# Altium PCB PCB1.PcbDoc
Units mm, origin at the board's own origin, x right, y up, seen from the top; angles counter-clockwise.
Board outline 29.77 x 25.83 mm, 2 copper layers (Top Layer, Bottom Layer); 17 components, 17 nets, 77 pads, 26 vias.
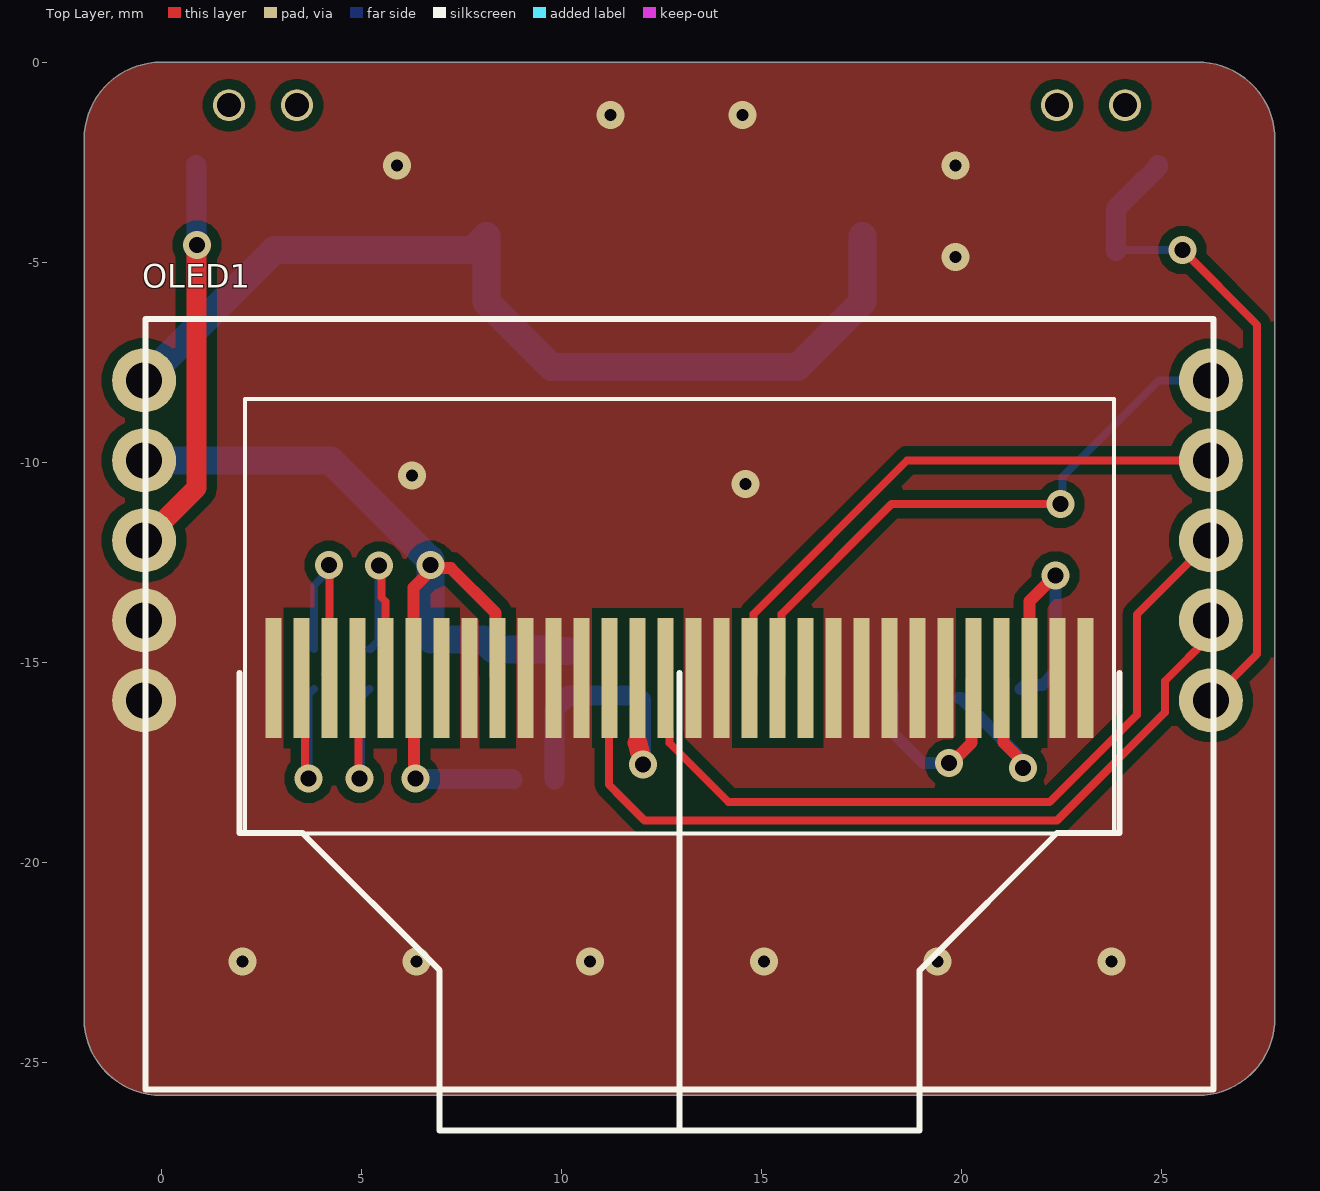
[diagram p0: Top Layer view]
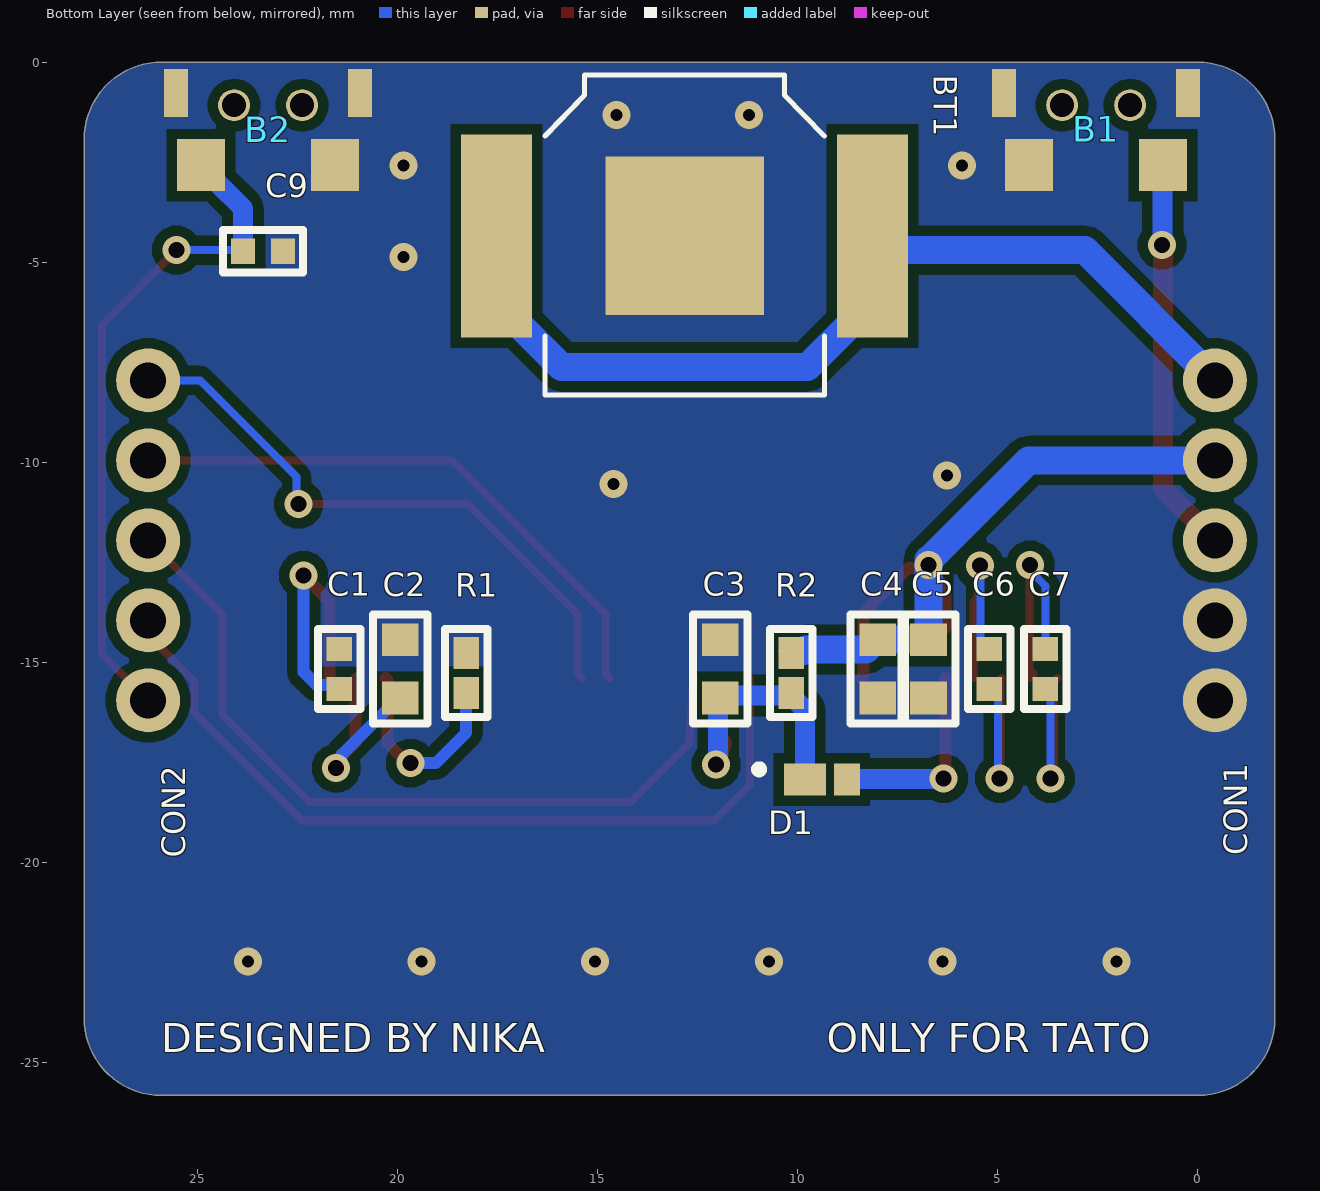
[diagram p1: Bottom Layer view, seen from below]

## Layer stack, top to bottom
Top Solder: solder mask 0.0102, Solder Resist, Dk 3.5
Top Layer: signal copper 0.0356
Dielectric 1: dielectric 0.32, FR-4, Dk 4.8
Bottom Layer: signal copper 0.0356
Bottom Solder: solder mask 0.0102, Solder Resist, Dk 3.5

## Board outline
0,-25.832 cw(c0,-23.901) -1.93,-23.901 -1.93,-1.93 cw(c0,-1.93) 0,0 26.035,0 26.05,-0.005 cw(c25.908,-1.93) 27.833,-1.788 27.838,-1.803 27.838,-24.028 27.833,-24.044 cw(c25.908,-23.901) 25.908,-25.832

## Design rules (kind name [scope] priority, off if disabled: settings)
Clearance [All] p1: gap=0.254 ignorepadtopadclearanceinfootprint=TRUE
MinimumSolderMaskSliver [All] p1: minsoldermaskwidth=0.08
PolygonConnect [All] p1: connectstyle=Direct reliefconductorwidth=0.254 reliefentries=4 polygonreliefangle="90 Angle" airgapwidth=0.254
RoutingVias [All] p1: holewidth=0.4 width=0.7 viastyle="Through Hole" minholewidth=0.3 minwidth=0.5 maxholewidth=1 maxwidth=1
SilkToSilkClearance [All] p1 off: silktosilkclearance=0.254
SilkToSolderMaskClearance [IsPad] p1 off: minsilkscreentomaskgap=0.15 clearancetoexposedcopper=TRUE
SolderMaskExpansion [All] p1: expansion=0 istentingtop=FALSE
SupplyNets "Schematic Supply Nets" [InNet('GND')] p1: voltage=0.000
Width [All] p1: maxlimit=0.7 minlimit=0.1 preferedwidth=0.2
27 further rules are at their usual default settings.

## Classes and differential pairs
component class RTC: B1 B2 BT1 C9 CON1 CON2
component class OLED: C1 C2 C3 C4 C5 C6 C7 D1 Oled1 R1 R2

## Components (designator, comment, footprint, x,y, rotation, side; value= is the part's Value field where it differs from the comment)
B1 "COMPONENT_1" SMD_90degree_booton 2.54,-1.676 r180 bottom
B2 "COMPONENT_1" SMD_90degree_booton 23.241,-1.676 r180 bottom
BT1 "2998" BAT_2998 12.827,-4.343 r180 bottom
C1 "CAP_0402" CAP_0402 21.463,-15.168 r90 bottom
C2 "4.7uF" CAP_0603 19.939,-15.168 r90 bottom
C3 "4.7uF" CAP_0603 11.938,-15.168 r90 bottom
C4 "10uF" CAP_0603 8.001,-15.168 r270 bottom
C5 "10uF" CAP_0603 6.731,-15.168 r270 bottom
C6 "CAP_0402" CAP_0402 5.207,-15.168 r90 bottom
C7 "CAP_0402" CAP_0402 3.81,-15.168 r90 bottom
C9 "CAP_0402" CAP_0402 23.368,-4.724 r180 bottom
CON1 "CON_1x6_2mm" CON_1x5_2mm -0.456,-12.953 r180 bottom
CON2 "CON_1x6_2mm" CON_1x5_2mm 26.214,-12.953 r180 bottom
D1 "NSR05F40QNXT5G" DIO_PMEG4005EPK 9.398,-17.932 r180 bottom
OLED1 "oled_lcd" oled_lcd 12.953,-13.874 r0 top (schematic designator Oled1)
R1 "RES_0402" RES_0402 18.288,-15.265 r270 bottom
R2 "RES_0402" RES_0402 10.16,-15.265 r270 bottom

## Footprints (in the part's own frame and the unit in brackets; to place one, negate y for a bottom-side part, rotate by r counter-clockwise, add the part's x,y. Pads: shape width x height; smd on the part's side, far side on the other; paste and mask are expansions set on the pad)
BAT_2998 [mm]
  rect 3.96x3.96 smd paste-3: N(0,0)
  rect 1.78x5.08 smd: P1(-4.7,0) P2(4.7,0)
  silkscreen extent -3.49,-3.98 3.49,4.02, body extent -5.23,-4.06 5.48,3.94, height 3.06
CAP_0402 [mm] "Chip Capacitor, 2-Leads, Body 1,06x0,51mm, IPC Medium Density"
  rect 0.6x0.64 smd: 1(-0.5,0) 2(0.5,0)
  silkscreen extent -1,-0.53 1,0.53, body extent -0.55,-0.26 0.55,0.25, height 0.5
CAP_0603 [mm] "Chip Capacitor, 2-Leads, Body 1,57x0,78mm, IPC Medium Density"
  rect 0.82x0.92 smd: 1(-0.73,0) 2(0.73,0)
  silkscreen extent -1.36,-0.68 1.36,0.68, body extent -0.8,-0.4 0.8,0.4, height 0.7
CON_1x5_2mm [mm]
  round 1.6 hole 0.9: 1(-0.025,5) 2(-0.025,3) 3(-0.025,1) 4(-0.025,-1) 5(-0.025,-3)
  body extent -1.02,-4.23 0.98,6.1, height 6.3
DIO_PMEG4005EPK [mm]
  rect 1.05x0.8 smd paste-0.05 mask+0.05: 1(-0.425,0)
  rect 0.65x0.8 smd paste-0.05 mask+0.05: 2(0.625,0)
  silkscreen extent -1.67,0.15 -1.47,0.35, body extent -0.5,-0.3 0.5,0.3, height 0.3
oled_lcd [mm]
  rect 0.4x3 smd: 1(-10.146,-1.518) 2(-9.446,-1.518) 3(-8.746,-1.518) 4(-8.046,-1.518) 5(-7.346,-1.518) 6(-6.646,-1.518) 7(-5.946,-1.518) 8(-5.246,-1.518) 9(-4.546,-1.518) 10(-3.846,-1.518) 11(-3.146,-1.518) 12(-2.446,-1.518) 13(-1.746,-1.518) 14(-1.046,-1.518) 15(-0.346,-1.518) 16(0.354,-1.518) 17(1.054,-1.518) 18(1.754,-1.518) 19(2.454,-1.518) 20(3.154,-1.518) 21(3.854,-1.518) 22(4.554,-1.518) 23(5.254,-1.518) 24(5.954,-1.518) 25(6.654,-1.518) 26(7.354,-1.518) 27(8.054,-1.518) 28(8.754,-1.518) 29(9.454,-1.518) 30(10.154,-1.518)
  silkscreen extent -13.35,-12.83 13.35,7.45, body extent -10.86,-5.4 10.86,5.46, height 1.5
RES_0402 [mm]
  rect 0.8x0.64 smd: 1(-0.5,0) 2(0.5,0)
  silkscreen extent -1.1,-0.53 1.1,0.53, body extent -0.55,-0.26 0.55,0.25, height 0.5
SMD_90degree_booton [mm]
  rect 1.2x1.3 smd: 1(-1.675,-0.9) 2(1.675,-0.9)
  rect 0.6x1.2 smd: 3(2.3,0.9) 4(-2.3,0.9)
  round 0.8 hole 0.6: 5(0.85,0.6) 6(-0.85,0.6)
  body extent -2.4,-1.3 2.4,2.6, height 1.8

## Part data
BT1: "Retenedor de baterÃ­a; SMT; Pila de botÃ³n de 6,8 mm; Bronce fosforado/EstaÃ±o-Niquelado", Package=None, Check_prices=https://www.snapeda.com/parts/2998/Keystone/view-part/?ref=eda, MF="Keystone Electronics", MP=2998, SnapEDA_Link=https://www.snapeda.com/parts/2998/Keystone/view-part/?ref=snap
C1 C6 C7 C9: Capacitance=0.1µF, Manufacturer="Taiyo Yuden", Manufacturer Part Number=UMK212B7104KG-T, Operating Temperature="-55°C ~ 125°C", Package / Case="0805 (2012 Metric)", PCN Part Number="X5R, X7R Dielectrics 23/Jan/2008", Ratings=-, Standard Package=1, Temperature Coefficient=X7R, Tolerance=±10%, Voltage - Rated=50V, Applications="General Purpose", Catalog Drawings="xMK Series_0805_1.25", Category=Capacitors, ComponentLink1Description=https://datasheet.ciiva.com/30243/163umk212b7104kg-t-30243740.pdf, ComponentLink1URL=https://datasheet.ciiva.com/30243/163umk212b7104kg-t-30243740.pdf, ComponentLink2Description=https://datasheet.ciiva.com/133/umk212b7104kg-t-ss-133568.pdf, ComponentLink2URL=https://datasheet.ciiva.com/133/umk212b7104kg-t-ss-133568.pdf, ComponentLink3Description=https://datasheet.ciiva.com/28645/746258-28645307.pdf, ComponentLink3URL=https://datasheet.ciiva.com/28645/746258-28645307.pdf, ComponentLink4Description=https://datasheet.ciiva.com/7975/746258-7975900.pdf, ComponentLink4URL=https://datasheet.ciiva.com/7975/746258-7975900.pdf, ComponentLink5Description=https://datasheet.ciiva.com/11786/0900766b80d84f1d-11786009.pdf, ComponentLink5URL=https://datasheet.ciiva.com/11786/0900766b80d84f1d-11786009.pdf, ComponentLink6Description=https://datasheet.ciiva.com/16625/upy-gphc-x7r-6-3v-to-50v-8-16625549.pdf, ComponentLink6URL=https://datasheet.ciiva.com/16625/upy-gphc-x7r-6-3v-to-50v-8-16625549.pdf, ComponentLink7Description=https://datasheet.ciiva.com/155/mlccorderingcode-155931.pdf, ComponentLink7URL=https://datasheet.ciiva.com/155/mlccorderingcode-155931.pdf, ComponentLink8Description=https://datasheet.ciiva.com/46393/1734573-46393307.pdf, ComponentLink8URL=https://datasheet.ciiva.com/46393/1734573-46393307.pdf, ComponentLink9Description=https://datasheet.ciiva.com/155/mlccorderingcode-155930.pdf, ComponentLink9URL=https://datasheet.ciiva.com/155/mlccorderingcode-155930.pdf, ComponentLink10Description=https://datasheet.ciiva.com/28450/1489800-28450805.pdf, ComponentLink10URL=https://datasheet.ciiva.com/28450/1489800-28450805.pdf, ComponentLink11Description=https://datasheet.ciiva.com/11464/upy-gphc-x7r-6-3v-to-50v-8-11464757.pdf, ComponentLink11URL=https://datasheet.ciiva.com/11464/upy-gphc-x7r-6-3v-to-50v-8-11464757.pdf, ComponentLink12Description=https://datasheet.ciiva.com/155/mlccorderingcode-155929.pdf, ComponentLink12URL=https://datasheet.ciiva.com/155/mlccorderingcode-155929.pdf, ComponentLink13Description=https://datasheet.ciiva.com/29242/445210-da-01-en-kerko-chip-0805-x7r-0-1uf-10proz-50vg-29242074.pdf, ComponentLink13URL=https://datasheet.ciiva.com/29242/445210-da-01-en-kerko-chip-0805-x7r-0-1uf-10proz-50vg-29242074.pdf, Family="Ceramic Capacitors", Featured Product="Commodity Multilayer Ceramic Capacitors – CC Series", Features=-, Height - Seated (Max)=-, Lead Spacing=-, Lead Style=-, Mounting Type="Surface Mount, MLCC", Online Catalog="M Series", Other Names=587-1279-6, Packaging=Digi-Reel®, Product Training Modules="Multilayer Ceramic Capacitors", Series=M, Size / Dimension="0.079\" L x 0.049\" W (2.00mm x 1.25mm)", Thickness (Max)="0.053\" (1.35mm)"
  C1 C6 C7: val=1uf
  C9: val=100nF
C2 C3 C4 C5: library part CAP_0603, "CAP_0603", note="any manufacturer"
  C2 C3: val=4.7uF
  C4 C5: val=10uF
CON1 CON2: library part CON_1x5_2mm, "CON_1x5_2mm"
R1: val=910k
R2: val=4.7k

## Via types
v1: diameter 0.7, hole 0.3, Top Layer to Bottom Layer, tented both sides, 13 vias
v2: diameter 0.7, hole 0.4, Top Layer to Bottom Layer, tented both sides, 13 vias

## Nets (pads, with @x,y where several pads share a name; then routed paths per layer and width w, separated by ;. In a path a pad name is that pad's centre, name@x,y a point inside that pad or via, vN(x,y) a via of type N, cw(c..) or ccw(c..) an arc to the next point about the centre after c; other vN are vias at no path point)
BTN1_2: B1.2 CON1.3 | length 9.9
  Top Layer w0.5: CON1.3 0.873,-10.649 0.873,-4.588 v2(0.889,-4.572)
  Bottom Layer w0.5: B1.2 0.877,-2.588 0.877,-4.56 v2(0.889,-4.572)
BTN2: B2.1 C9.1 CON2.5 | length 16.8
  Top Layer w0.2: v2(25.527,-4.699) 27.393,-6.565 27.393,-14.799 CON2.5
  Bottom Layer w0.2: C9.1 23.893,-4.699 v2(25.527,-4.699)
  Bottom Layer w0.5: C9.1 23.868,-3.654 24.546,-2.976 24.566,-2.976 24.916,-2.626 B2.1
CLK: CON2.2 OLED1.18 | length 14.7
  Top Layer w0.2: OLED1.18 14.808,-15.292 14.808,-13.792 18.646,-9.953 CON2.2
CS: CON2.4 OLED1.13 | length 20.8
  Top Layer w0.2: OLED1.13 11.188,-16.792 11.188,-17.561 11.188,-18.063 11.543,-18.419 12.079,-18.954 22.388,-18.954 25.085,-16.258 25.085,-15.475 26.239,-14.321 CON2.4
D/C: CON2.3 OLED1.15 | length 20
  Top Layer w0.2: OLED1.15 12.708,-16.792 12.708,-17.026 14.182,-18.5 22.2,-18.5 24.384,-16.317 24.384,-13.808 CON2.3
GND: B1.1 B1.3 B1.4 B2.2 B2.3 B2.4 BT1.N C1.2 C2.2 C3.2 C4.2 C5.2 C9.2 CON1.4 CON1.5 OLED1.1 OLED1.8 OLED1.10 OLED1.11 OLED1.12 OLED1.16 OLED1.17 OLED1.21 OLED1.22 OLED1.23 OLED1.24 OLED1.25 OLED1.29 OLED1.30 R1.1
  other v1: 2.032,-22.479 6.375,-22.479 10.719,-22.479 15.062,-22.479 19.406,-22.479 23.749,-22.479 14.605,-10.541 6.269,-10.334 19.858,-4.873 5.888,-2.587 19.858,-2.587 11.222,-1.317 14.524,-1.317
MOSI: CON2.1 OLED1.19 | length 15.2
  Top Layer w0.2: OLED1.19 15.508,-15.292 15.508,-13.792 18.25,-11.049 v2(22.479,-11.049)
  Bottom Layer w0.2: v2(22.479,-11.049) 22.527,-11.001 22.527,-10.366 24.94,-7.953 CON2.1
NetC1_1: C1.1 OLED1.28 | length 6.3
  Top Layer w0.3: OLED1.28 21.708,-13.471 v2(22.352,-12.827)
  Bottom Layer w0.3: C1.1@21.483,-15.668 21.578,-15.574 22.025,-15.574 22.352,-15.247 v2(22.352,-12.827)
NetC2_1: C2.1 OLED1.27 | length 4.9
  Top Layer w0.3: OLED1.27 21.058,-15.442 21.058,-17.014 21.537,-17.493 v2(21.537,-17.646)
  Bottom Layer w0.3: C2.1 19.989,-15.898 21.403,-17.313 21.403,-17.512 v2(21.537,-17.646)
NetC3_1: C3.1 D1.1 OLED1.14 R2.2 | length 6.3
  Top Layer w0.5: 11.904,-17.018 v2(12.042,-17.561)
  Bottom Layer w0.5: D1.1 9.823,-16.182 10.174,-15.832 11.871,-15.832 11.99,-15.951 11.99,-17.509 v2(12.042,-17.561)
NetC6_1: C6.1 OLED1.4 | length 4.9
  Top Layer w0.2: OLED1.4 4.93,-15.415 4.93,-17.884 v2(4.953,-17.907)
  Bottom Layer w0.2: v2(4.953,-17.907) 4.987,-17.873 4.987,-15.868 5.187,-15.668 C6.1
NetC6_2: C6.2 OLED1.5 | length 5.1
  Top Layer w0.2: v2(5.445,-12.589) 5.508,-12.651 5.508,-13.389 5.608,-13.489 OLED1.5
  Bottom Layer w0.2: C6.2 5.227,-14.668 5.427,-14.468 5.427,-12.607 v2(5.445,-12.589)
NetC7_1: C7.1 OLED1.2 | length 4.9
  Top Layer w0.2: OLED1.2 3.595,-15.48 3.595,-17.819 v2(3.683,-17.907)
  Bottom Layer w0.2: v2(3.683,-17.907) 3.683,-15.795 C7.1
NetC7_2: C7.2 OLED1.3 | length 5.2
  Top Layer w0.2: v2(4.191,-12.573) 4.199,-12.581 4.199,-15.201 4.108,-15.292 OLED1.3
  Bottom Layer w0.2: C7.2 3.81,-13.089 4.191,-12.708 v2(4.191,-12.573)
NetOled1_26: OLED1.26 R1.2 | length 5.1
  Top Layer w0.3: v2(19.685,-17.526) 19.745,-17.526 20.258,-17.014 20.258,-15.442 OLED1.26
  Bottom Layer w0.3: R1.2 18.288,-16.764 19.05,-17.526 v2(19.685,-17.526)
RTC_1.5V: BT1.P1 BT1.P2 CON1.1 | length 24.1
  Bottom Layer w0.7: CON1.1 2.823,-4.699 7.771,-4.699 BT1.P2 8.127,-5.993 9.754,-7.62 15.9,-7.62 17.527,-5.993 BT1.P1
VCC: C4.1 C5.1 CON1.2 D1.2 OLED1.6 OLED1.9 R2.1 | length 24.2
  Top Layer w0.3: OLED1.6 6.312,-15.396 v2@6.312,-17.869 ; OLED1.6@6.308,-14.142 6.308,-13.132 6.731,-12.708 v2(6.731,-12.573) 6.808,-12.65 7.236,-12.65 8.358,-13.771 8.358,-15.342 OLED1.9
  Top Layer w0.5: v2@6.312,-17.869 v2(6.35,-17.907)
  Bottom Layer w0.5: v2(6.35,-17.907) 6.363,-17.92 8.76,-17.92 D1.2
  Bottom Layer w0.7: CON1.2 4.23,-9.953 v2@6.731,-12.454 ; v2@6.731,-12.438 C5.1 8.051,-14.438 8.298,-14.685 9.813,-14.685 9.843,-14.715 R2.1@10.13,-14.715
pads on no net: B1.5 B1.6 B2.5 B2.6 OLED1.7 OLED1.20

## Polygon pours and split planes (outlines as drawn)
GND on Top Layer "GND_L01_P000" (solid, remove dead copper, pour order 0): 0,-25.832 cw(c0,-23.901) -1.93,-23.901 -1.93,-1.93 cw(c0,-1.93) 0,0 26.035,0 26.05,-0.005 cw(c25.908,-1.93) 27.833,-1.788 27.838,-1.803 27.838,-24.028 27.833,-24.044 cw(c25.908,-23.901) 25.908,-25.832
GND on Bottom Layer "GND_L02_P001" (solid, remove dead copper, pour order 1): 0,-25.832 cw(c0,-23.901) -1.93,-23.901 -1.93,-1.93 cw(c0,-1.93) 0,0 26.035,0 26.05,-0.005 cw(c25.908,-1.93) 27.833,-1.788 27.838,-1.803 27.838,-24.028 27.833,-24.044 cw(c25.908,-23.901) 25.908,-25.832

## Silkscreen, mask and mechanical layers (free items; w line width, h text height)
Bottom Overlay:
  text "ONLY FOR TATO" at 9.271,-25.005 h1.25
  text "DESIGNED BY NIKA" at 25.908,-25.005 h1.25
Mechanical 1:
  lines w0.05: 25.908,-0.025 cw(c25.908,-1.93) 27.813,-1.93 ; 26.035,-0.025 0,-0.025 ccw(c0,-1.93) -1.905,-1.93 -1.905,-23.901 ccw(c0,-23.901) 0,-25.806 25.908,-25.806 ccw(c25.908,-23.901) 27.813,-23.901 ; 27.813,-24.028 27.813,-1.803